# Altium PCB GEARDRONE_LITE_BOM.PcbDoc
Units mm, origin at the board's own origin, x right, y up, seen from the top; angles counter-clockwise.
Board outline 82.98 x 82.51 mm, 4 copper layers (Top Layer, GND, VCC, Bottom Layer), stack 0.852 mm thick; 77 components, 42 nets, 288 pads, 65 vias.
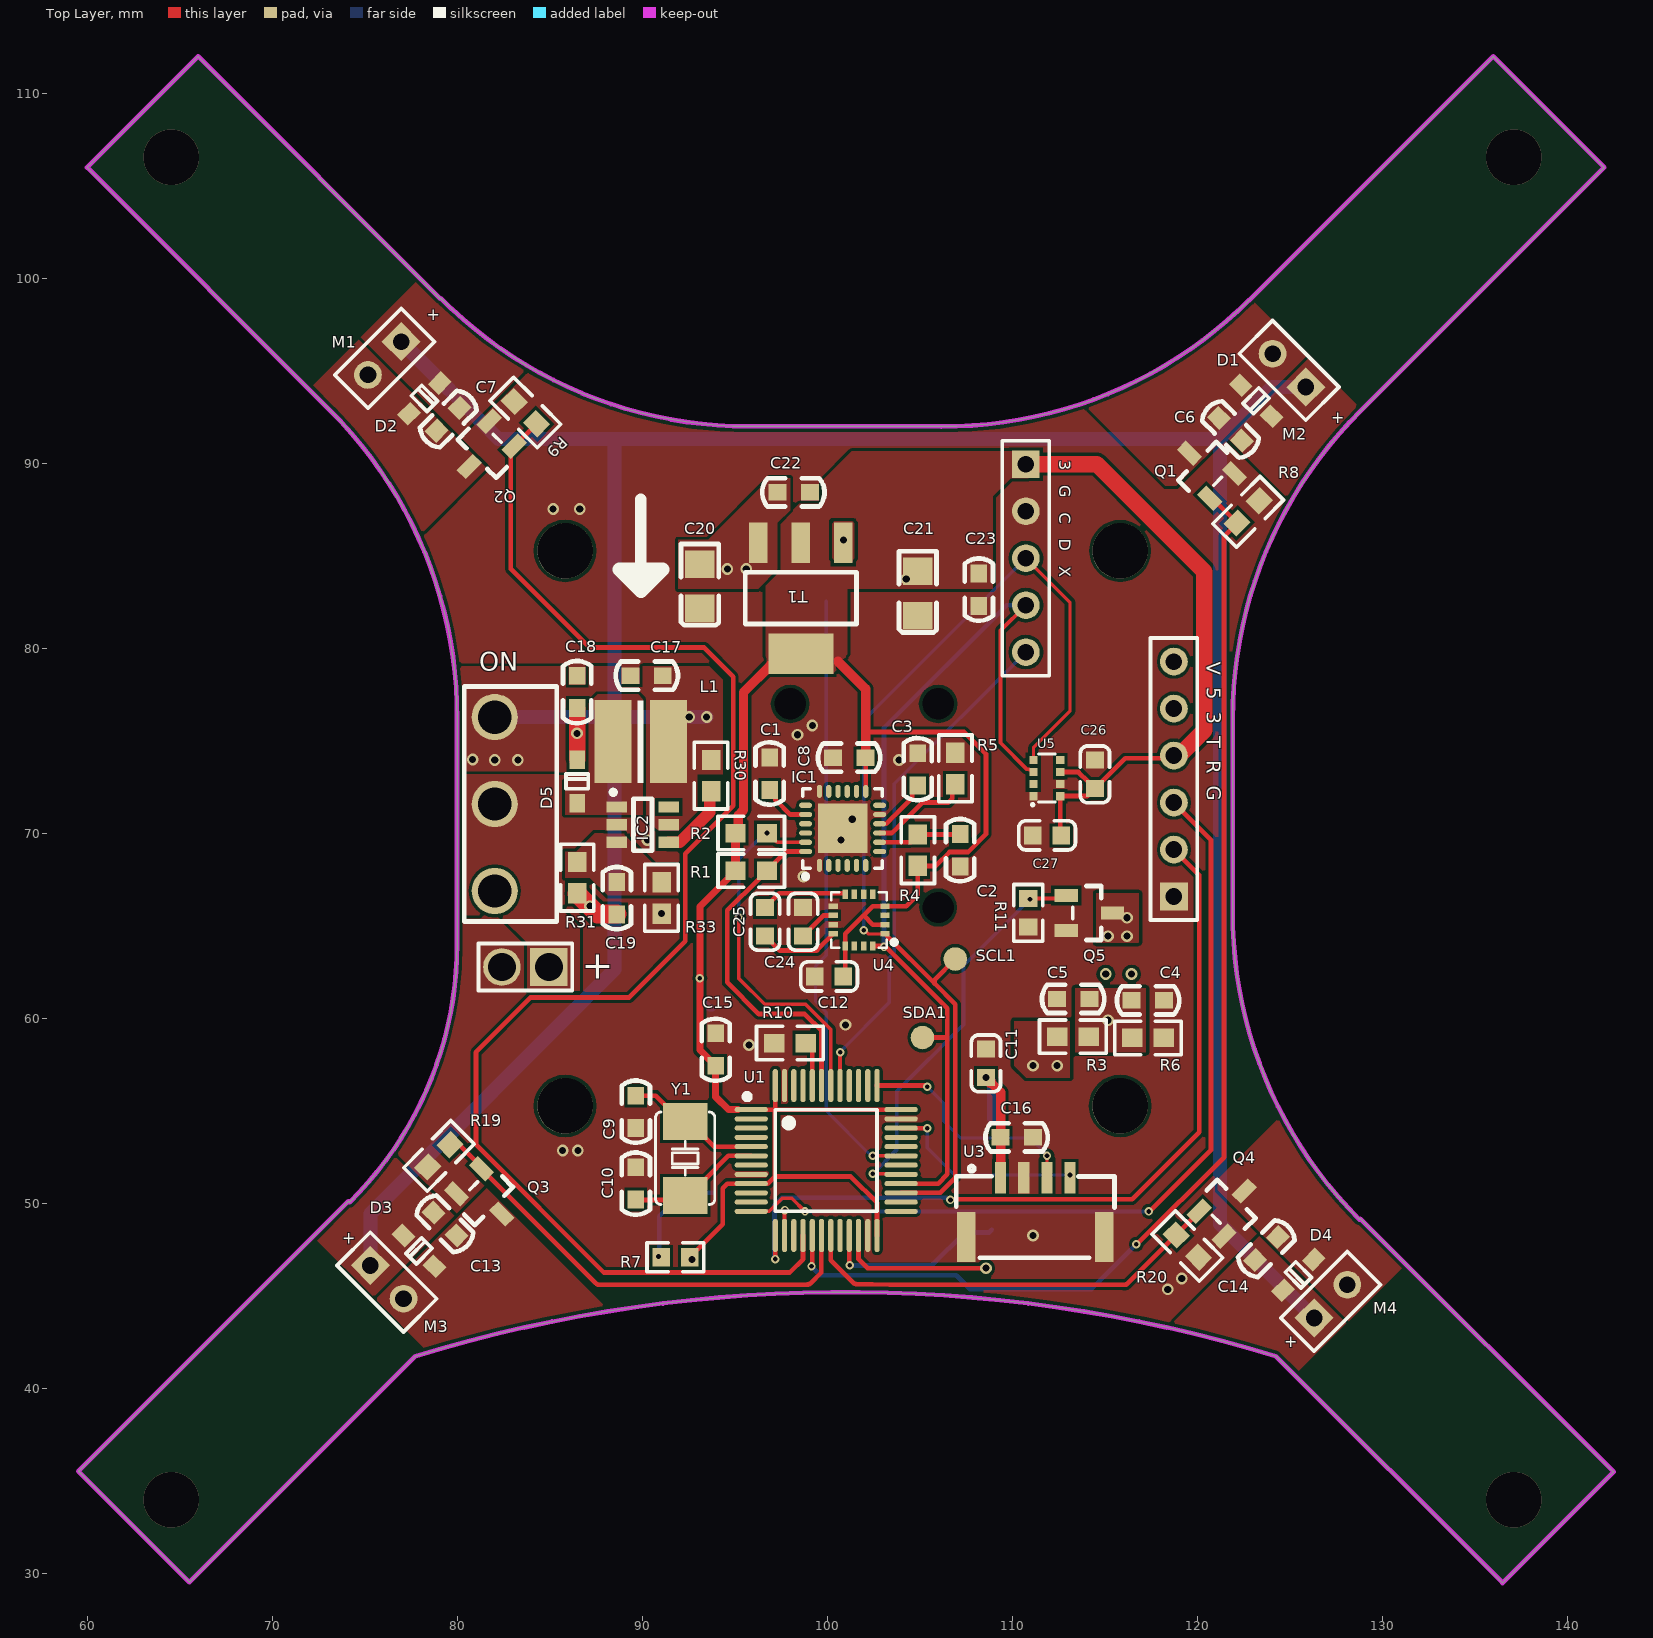
[diagram p0: Top Layer view]
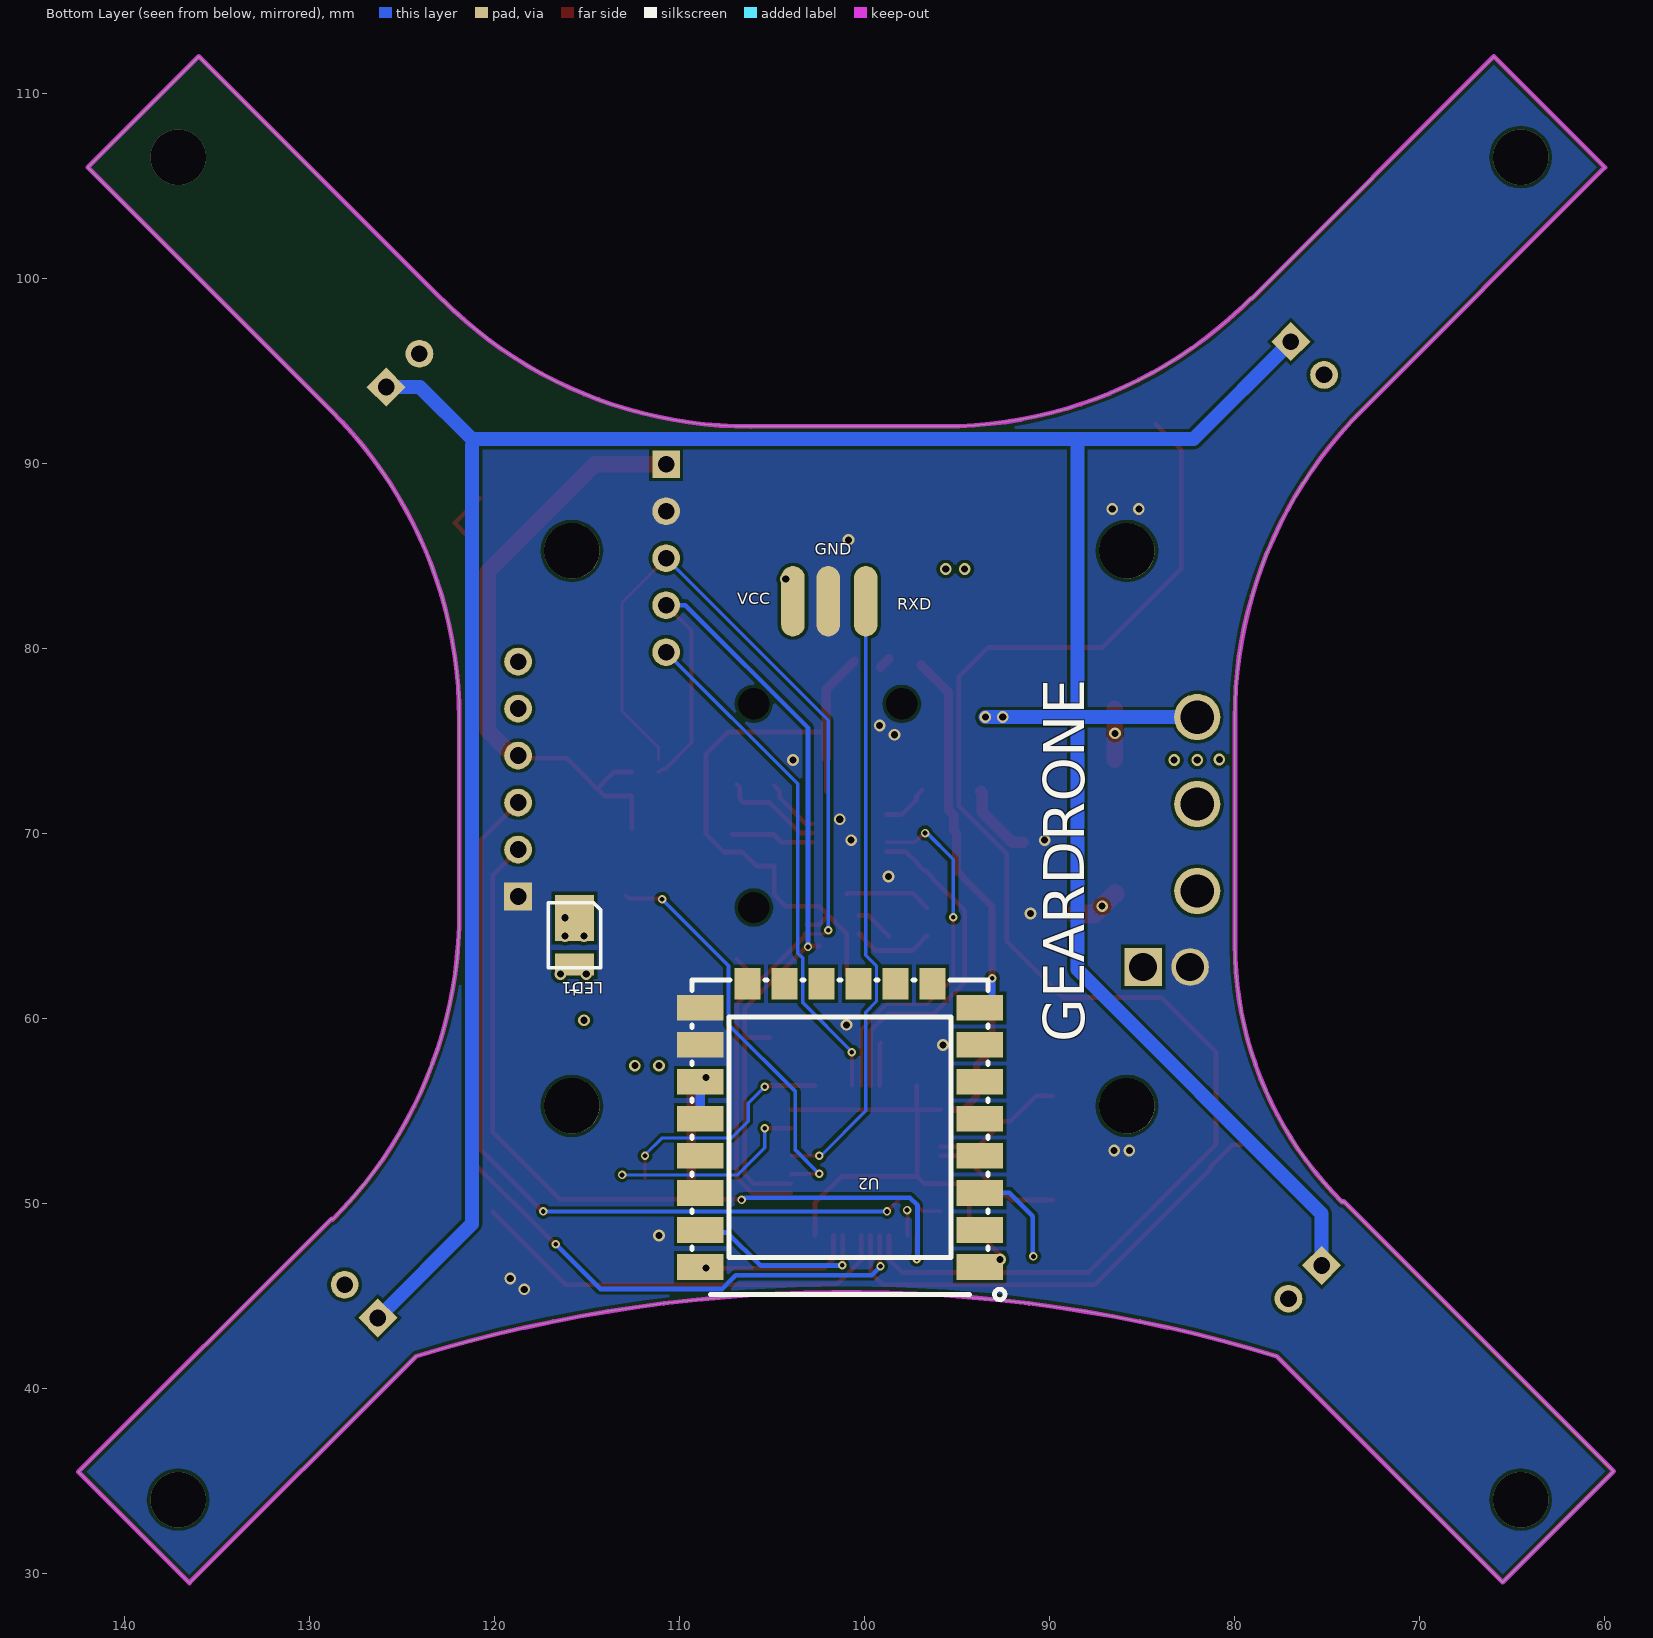
[diagram p1: Bottom Layer view, seen from below]
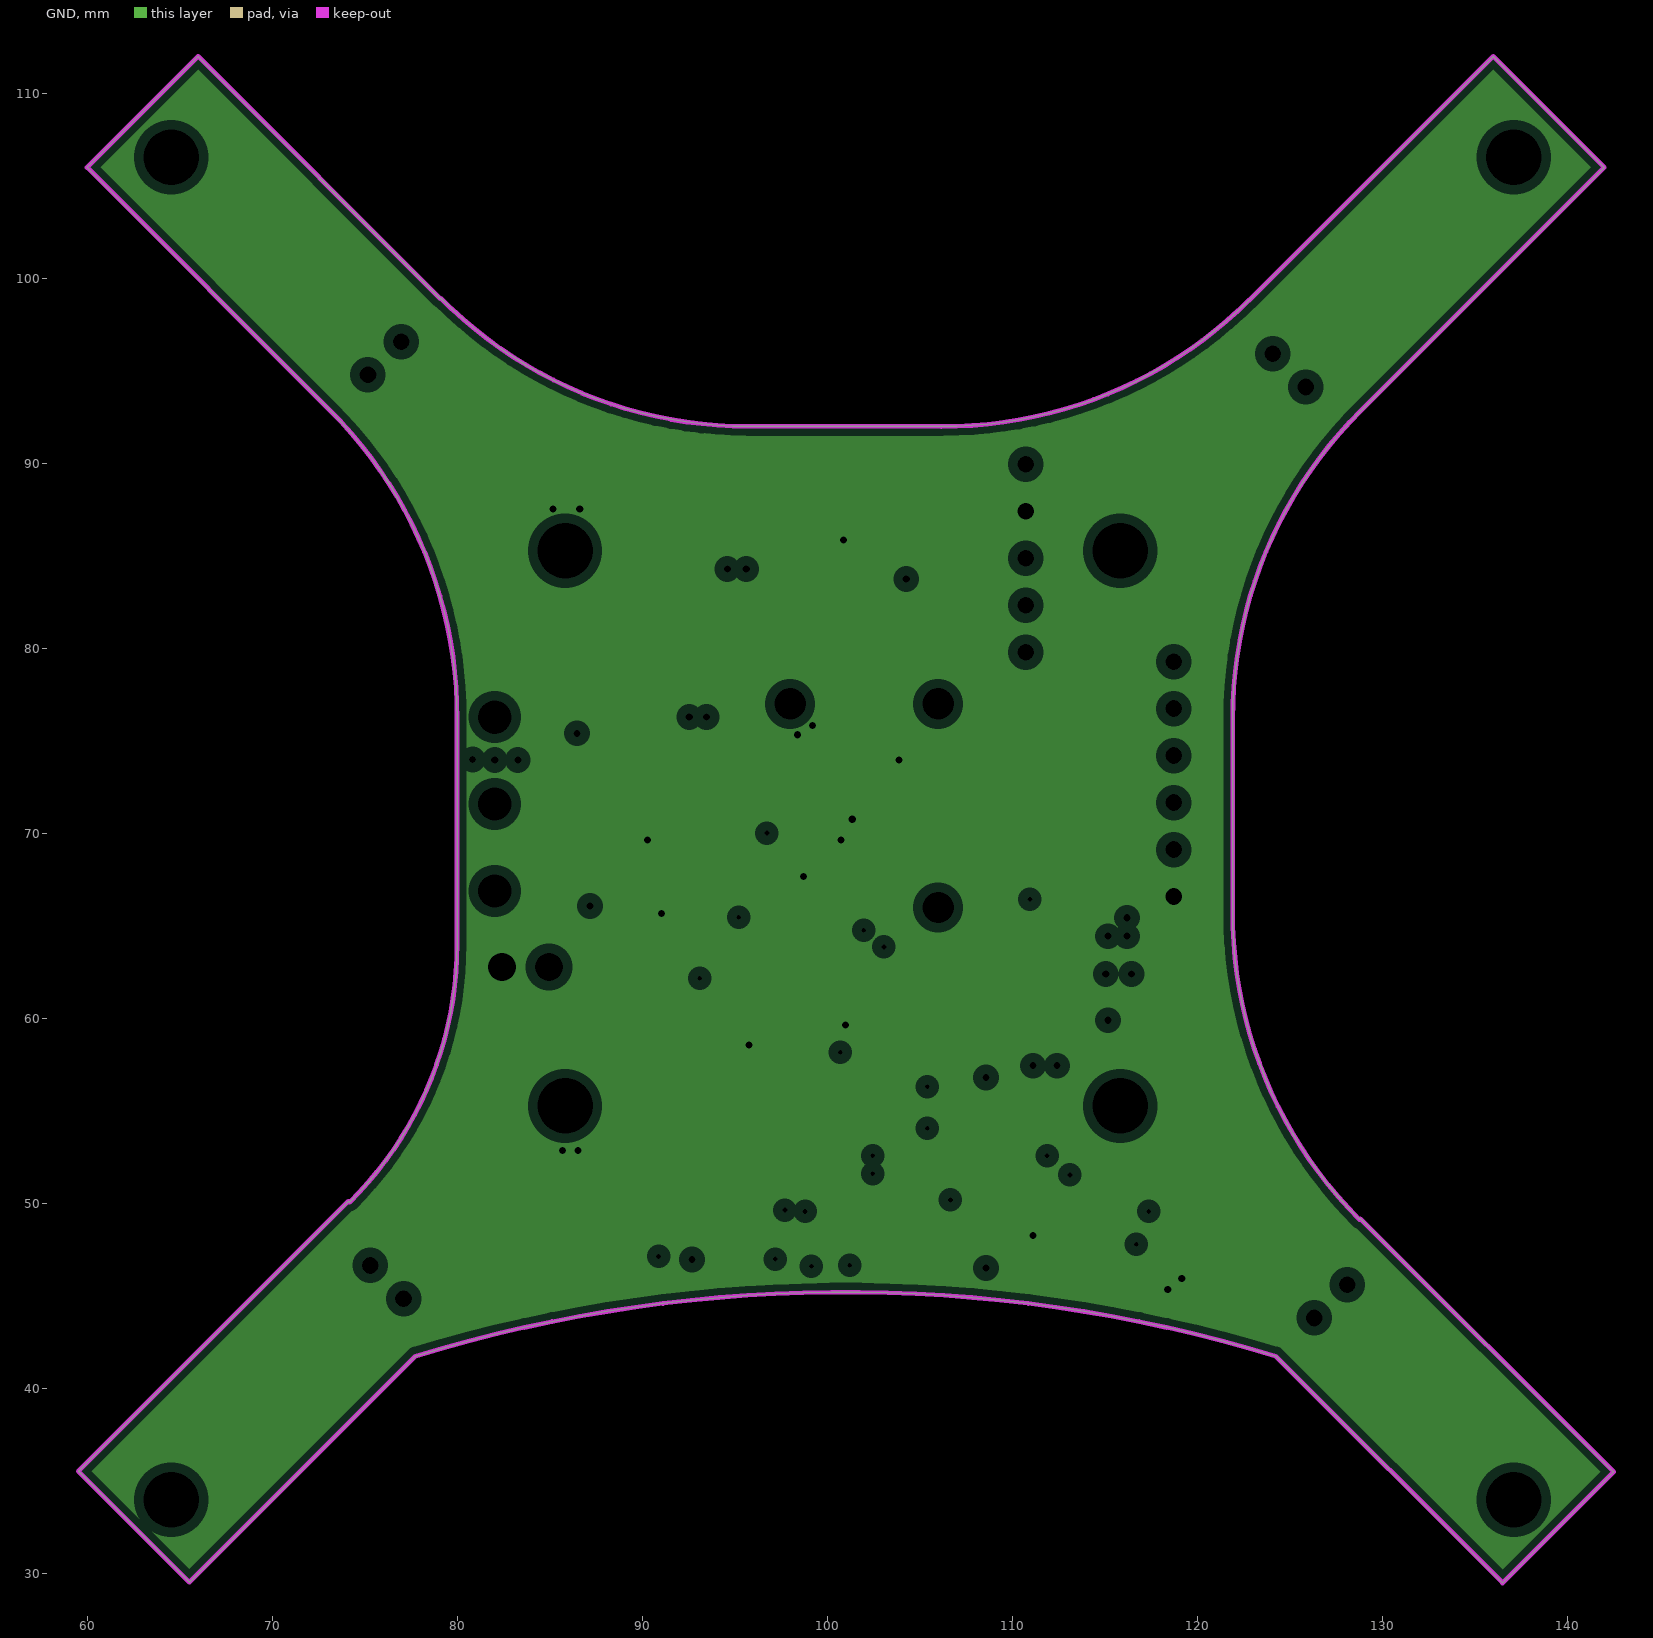
[diagram p2: GND, clearances drawn from the general rule]
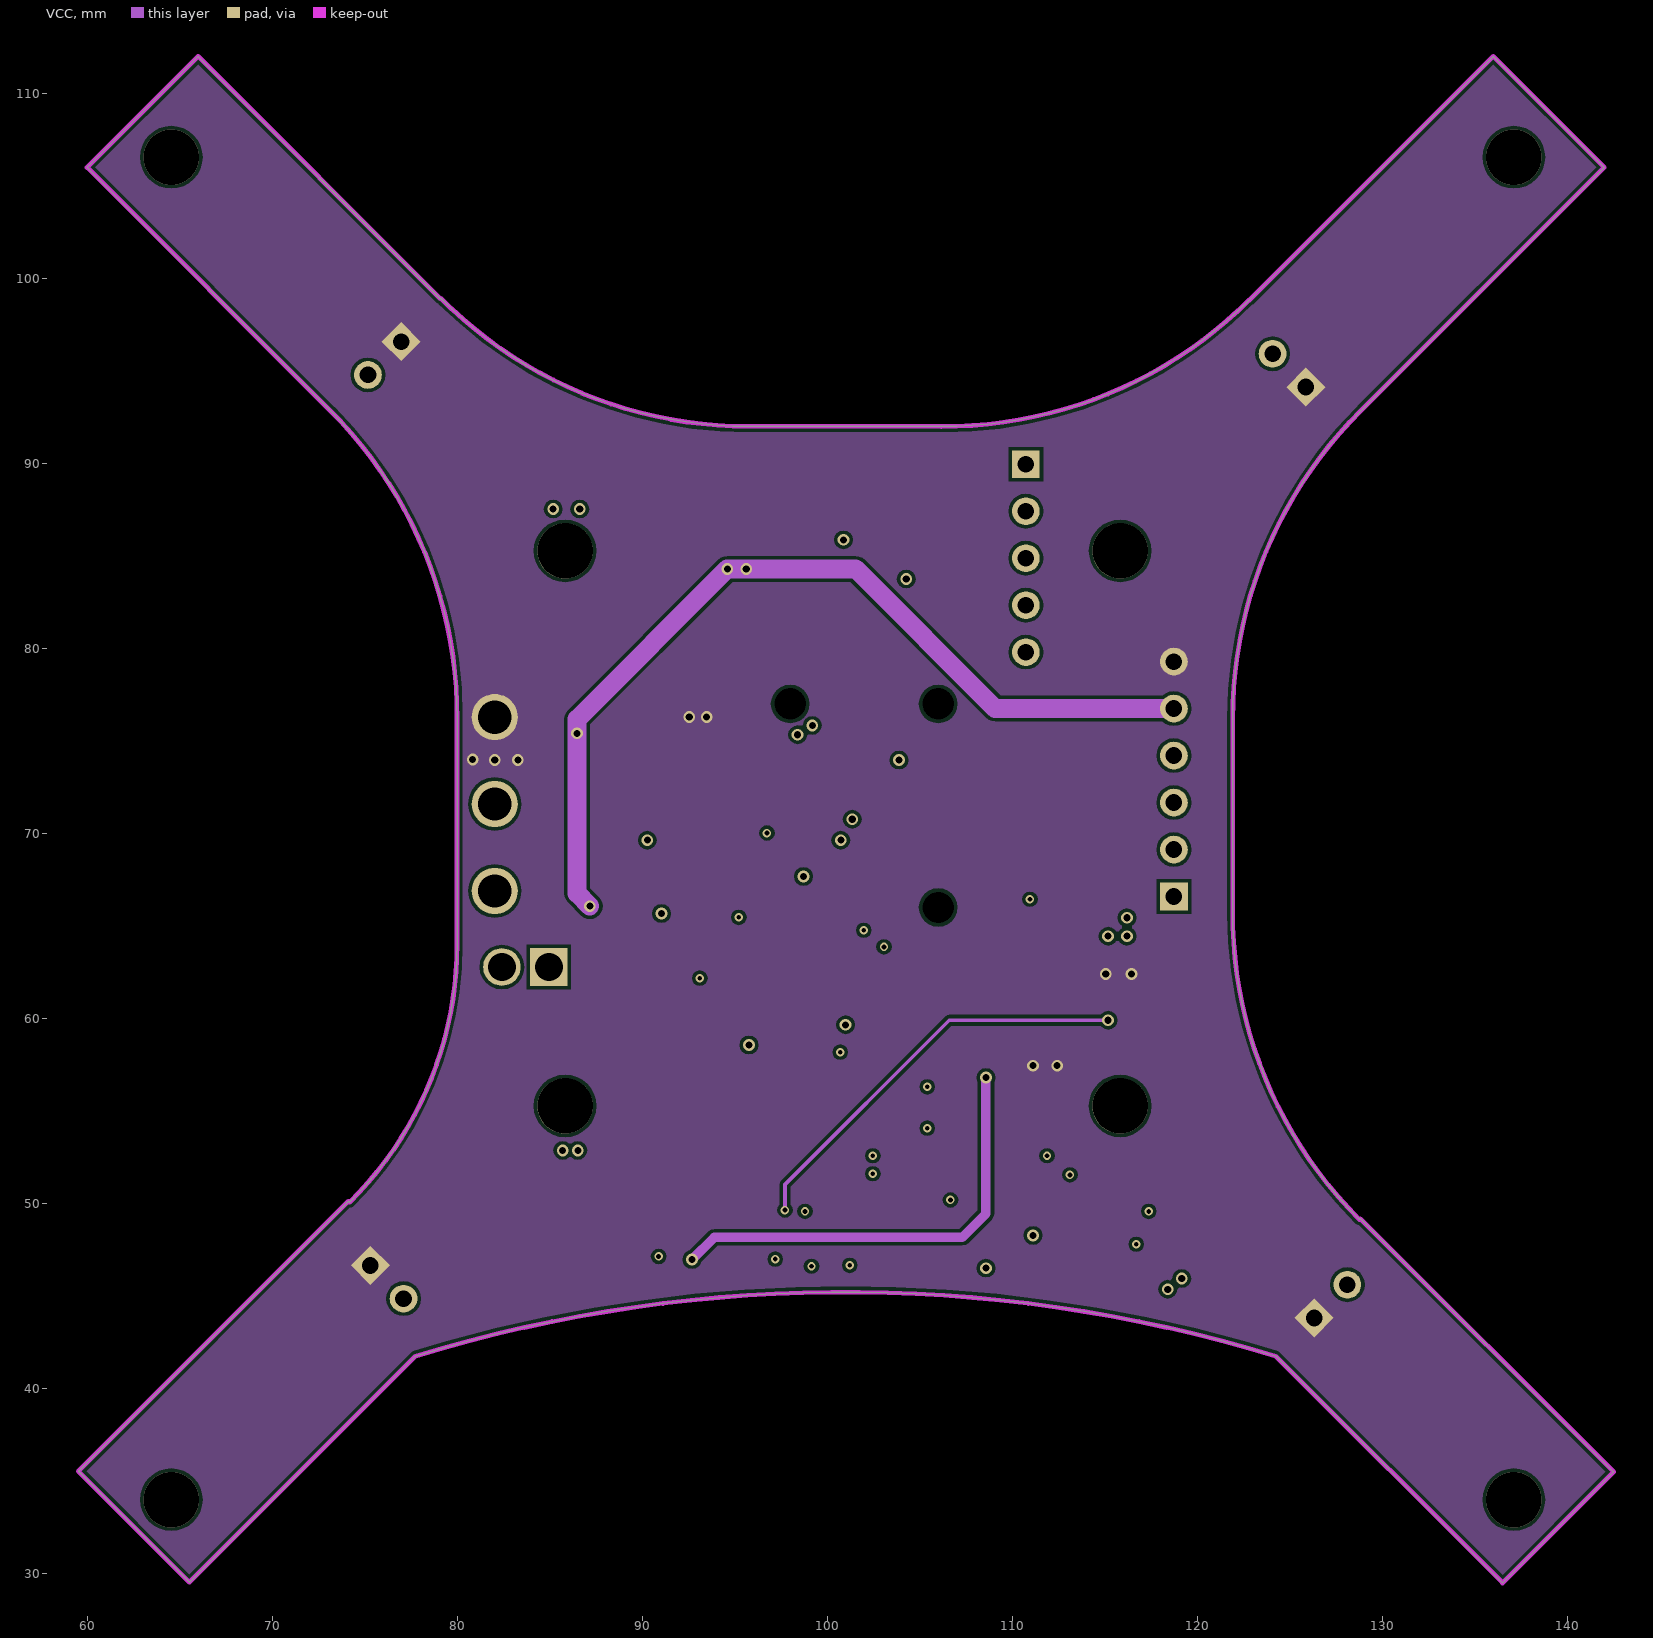
[diagram p3: VCC]
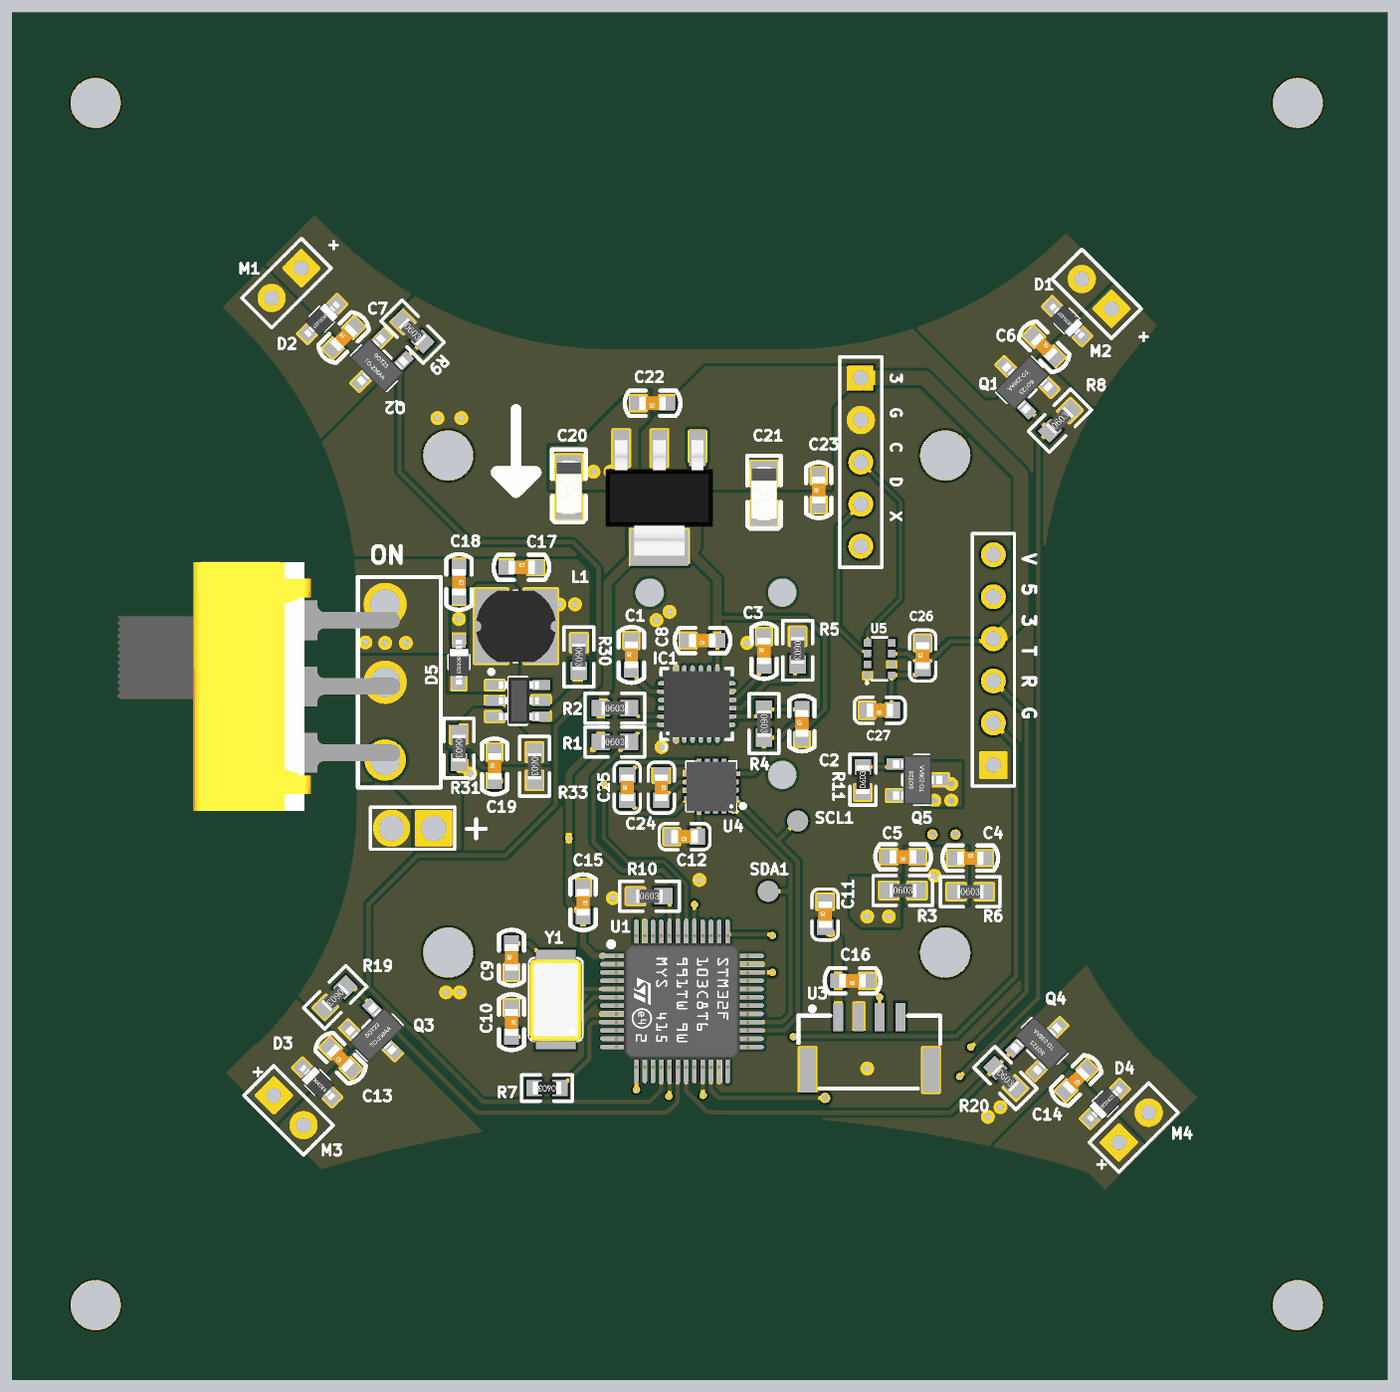
[diagram p4: 3D render of the assembled board from above, using the file's embedded part models]

## Layer stack, top to bottom
Top Solder: solder mask 0.0102, Solder Resist, Dk 3.5
Top Layer: signal copper 0.0356
Dielectric 1: dielectric 0.32, FR-4, Dk 4.8
GND: plane copper 0.035, net GND
Dielectric2: dielectric 0.32, FR-4, Dk 4.8
VCC: signal copper 0.035
Dielectric 2: prepreg 0.0711, PP-006, Dk 4.1
Bottom Layer: signal copper 0.0356
Bottom Solder: solder mask 0.0102, Solder Resist, Dk 3.5

## Board outline
59.533,35.533 65.533,29.533 77.75,41.75 cw(c101,-34.572) 124.25,41.75 136.508,29.492 142.508,35.492 128.817,49.183 128.77,49.136 cw(c145.307,65.673) 121.92,65.786 121.92,76.233 cw(c145.307,76.233) 128.85,92.85 142,106 136,112 122.836,98.836 122.822,98.85 cw(c106.285,115.387) 106.172,92 106.169,92.003 95.738,92.003 cw(c95.738,115.391) 79.121,98.933 79.094,98.906 66,112 60,106 73.151,92.849 73.15,92.85 cw(c56.613,76.313) 80,76.2 80,64.008 cw(c60.38,64.008) 74.186,50.068 74.127,50.127

## Design rules (kind name [scope] priority, off if disabled: settings)
Clearance [All] p1: gap=0.178 ignorepadtopadclearanceinfootprint=FALSE
HoleSize [All] p1: absolutevalues=TRUE maxlimit=5.08 minlimit=0.025 maxpercent=80.000 minpercent=20.000
MinimumSolderMaskSliver [All] p1: minsoldermaskwidth=0
PlaneClearance [All] p1: clearance=0.508
PlaneConnect [All] p1: planeconnectstyle=Direct reliefexpansion=0.508 reliefentries=4 reliefconductorwidth=0.254 reliefairgap=0.254
PolygonConnect [All] p1: connectstyle=Direct reliefconductorwidth=0.254 reliefentries=4 polygonreliefangle="90 Angle" airgapwidth=0.254
RoutingVias [All] p1: holewidth=0.508 width=0.635 viastyle="Through Hole" minholewidth=0.203 minwidth=0.381 maxholewidth=3.81 maxwidth=3.81
SilkToSilkClearance [All] p1: silktosilkclearance=0
SilkToSolderMaskClearance [IsPad] p1: minsilkscreentomaskgap=0 clearancetoexposedcopper=TRUE
SolderMaskExpansion [All] p1: expansion=0.102 istentingtop=FALSE
Width [All] p1: maxlimit=3.048 minlimit=0.178 preferedwidth=0.254
24 further rules are at their usual default settings.

## Components (designator, comment, footprint, x,y, rotation, side; value= is the part's Value field where it differs from the comment)
"3   G   C   D   X" "Header 5" HDR1X5 110.743,89.959 r270 top (schematic designator TOF)
+ "Header 2" HDR1X2#1 84.962,62.781 r180 top (schematic designator POWER1)
C1 "2.2nf" C0603 96.892,72.352 r90 top value=2.2nF
C2 "10nf" C0603 107.187,68.211 r90 top value=10nF
C3 "104" C0603 104.901,72.585 r90 top
C4 "104" C0603 116.458,60.978 r0 top
C5 "106" C0603 114.186,61.054 r180 top
C6 "104" C0603 121.175,92.468 r315 top
C7 "104" C0603 78.897,91.768 r45 top
C8 "104" C0603 102.079,74.105 r180 top
C9 "20pf" C0603 89.661,54.074 r90 top value=22pF
C10 "22pF" C0603 89.661,51.961 r270 top
C11 "104" 0603_C 108.584,57.574 r90 top
C12 "104" 0603_C 100.105,62.273 r180 top
C13 "104" C0603 79.972,48.274 r135 top
C14 "104" C0603 124.369,48.184 r225 top
C15 "104" C0603 93.979,59.2 r270 top
C16 "104" C0603 111.129,53.574 r180 top
C17 "22uf" C0603 89.367,78.529 r0 top value=22uF
C18 "22uf" C0603 86.486,78.529 r270 top value=22uF
C19 "15pf" C0603 88.639,65.617 r90 top value=15pF
C20 "ECAP" TAN-A-3216 93.122,83.355 r270 top
C21 "ECAP" TAN-A-3216 104.901,82.974 r270 top
C22 "0.1uf" C0603 99.066,88.435 r180 top value=0.1uF
C23 "0.1uf" C0603 108.203,82.294 r90 top value=0.1uF
C24 "4.7uf" 0603_C 98.699,65.23 r270 top
C25 "0.22uf" 0603_C 96.646,65.23 r90 top
C26 "104" 0603_C 114.478,73.195 r90 top
C27 "104" 0603_C 111.886,69.897 r180 top
D1 "SS14" SOD-323 123.189,93.388 r135 top
D2 "SS14" SOD-323 78.231,93.515 r225 top
D3 "SS14" SOD-323 77.94,47.44 r315 top
D4 "SS14" SOD-323 125.475,46.144 r45 top
D5 "SS14" SOD-323 86.486,72.814 r270 top
GND "TestPoint" TestPoint#1 101.981,82.55 r90 bottom
IC1 "MPU6050" LC-QFN-24_4X4X05P 100.837,70.274 r0 top
IC2 "SX1308" LC-SOT-23-6 90.039,70.474 r180 top
L1 "4.7uH" CD43NP 89.915,74.973 r180 top
LED1 "EFD3-G9CA-P1WF" LED3528 115.696,64.178 r270 bottom
M1 "Header 2" HDR1X2#2 76.979,96.581 r225 top
M2 "Header 2" HDR1X2#2 125.874,94.132 r135 top
M3 "Header 2" HDR1X2#2 75.31,46.652 r315 top
M4 "Header 2" HDR1X2#2 126.321,43.815 r45 top
ON "SW-SPDT" SW-TH_SS-12D10L5 82.036,71.591 r270 top (schematic designator S1)
Q1 "SI2302" LC-SOT-23(SOT-23-3) 120.468,89.674 r315 top
Q2 "SI2302" LC-SOT-23(SOT-23-3) 81.533,90.721 r45 top
Q3 "SI2302" LC-SOT-23(SOT-23-3) 81.528,50.316 r135 top
Q4 "SI2302" LC-SOT-23(SOT-23-3) 121.666,49.788 r225 top
Q5 "SI2302" LC-SOT-23(SOT-23-3) 114.172,65.702 r180 top
R1 "10k" R0603 95.899,67.988 r0 top value=10KΩ
R2 "10k" R0603 95.899,70.024 r0 top value=10KΩ
R3 "10k" R0603 113.283,59.022 r0 top value=10KΩ
R4 "0" R0603 104.901,69.096 r270 top value=0Ω
R5 "0" R0603 106.933,73.518 r270 top value=0Ω
R6 "10k" R0603 117.347,58.946 r0 top value=10KΩ
R7 "10k" 0603_R 91.803,47.095 r180 top value=10KΩ
R8 "10k" R0603 122.759,87.383 r45 top value=10KΩ
R9 "10k" R0603 83.692,92.753 r315 top value=10KΩ
R10 "10kΩ" R0603 97.986,58.674 r0 top value=10KΩ
R11 "10k" 0603_R 110.87,65.71 r90 top value=10KΩ
R19 "10k" R0603 79.02,52.574 r225 top value=10KΩ
R20 "10k" R0603 119.472,47.702 r315 top value=10KΩ
R30 "100k" R0603 93.725,73.124 r270 top value=100KΩ
R31 "73.2k" R0603 86.486,67.612 r270 top value=73.2KΩ
R33 "10k" R0603 91.05,66.519 r270 top value=10KΩ
RXD "TestPoint" TestPoint#1 99.949,82.55 r90 bottom
SCL1 "TestPoint" TestPoint#2 106.933,63.215 r90 top
SDA1 "TestPoint" TestPoint#2 105.155,58.971 r90 top
T1 "AMS1117-3.3" LC-SOT-223 98.583,82.72 r90 top
U1 "STM32F103C8T6" LC-LQFP-48_7X7X05P 99.949,52.324 r270 top
U2 "ESP-12F(ESP8266MOD)" WIFIM-SMD_ESP-12F-ESP8266MOD 101.346,54.229 r90 bottom
U3 "SM04B-GHS-TB(LF)(SN)" CONN-SMD_4P-P1.25_SM04B-GHS-TB-LF-SN 111.252,49.784 r0 top
U4 "QMC5883L" LPCC-16_L3.0-W3.0-P0.50-BL 101.726,65.321 r90 top
U5 "SPL06-001" SENSOR-SMD_SPL06-001 111.876,72.995 r270 top
"V  5  3  T  R  G" "Header 6" HDR1X6 118.744,66.591 r90 top (schematic designator "V 5 3 T R")
VCC "TestPoint" TestPoint#1 103.886,82.55 r90 bottom
Y1 "5032" SMD5032-2 92.329,52.443 r90 top

## Footprints (in the part's own frame and the unit in brackets; to place one, negate y for a bottom-side part, rotate by r counter-clockwise, add the part's x,y. Pads: shape width x height; smd on the part's side, far side on the other; paste and mask are expansions set on the pad)
0603_C [mm]
  rect 0.93x0.98 smd: 1(-0.77,0) 2(0.77,0)
  silkscreen extent -1.53,-0.79 1.54,0.79, body extent -0.8,-0.4 0.8,0.4, height 0.3
0603_R [mm]
  rect 0.93x0.98 smd: 1(-0.77,0) 2(0.77,0)
  silkscreen extent -1.53,-0.79 1.54,0.79, body extent -0.85,-0.4 0.85,0.4, height 0.56
C0603 [mil]
  rect 38x35 smd: 1(0,0) 2(69,0)
  silkscreen extent -31,-30 101,30, body extent 4,-16 67,16, height 12
CD43NP [mm] "功率电感"
  rect 2x4.5 smd: 1(-1.512,0) 2(1.488,0)
  silkscreen extent -0.17,-2.21 0.17,2.24, body extent -2.41,-2.14 2.39,2.16, height 3.5
CONN-SMD_4P-P1.25_SM04B-GHS-TB-LF-SN [mm]
  rect 0.6x1.7 smd: 1(-1.876,1.6) 2(-0.626,1.6) 3(0.624,1.6) 4(1.875,1.6)
  rect 1x2.7 smd: 5(3.725,-1.6) 6(-3.725,-1.6)
  silkscreen extent -4.27,-2.71 4.28,2.24
HDR1X2#1 [mil] "Connector; Header; 2 Position"
  rect 80x80 hole 60: 1(0,0)
  round 80 hole 60: 2(100,0)
  silkscreen extent -50,-50 150,50
HDR1X2#2 [mil] "Connector; Header; 2 Position"
  rect 59.06x59.06 hole 35.43: 1(0,0)
  round 59.06 hole 35.43: 2(100,0)
  silkscreen extent -50,-50 150,50
HDR1X5 [mm] "Connector; Header; 5 Position"
  rect 1.5x1.5 hole 0.9: 1(0,0)
  round 1.5 hole 0.9: 2(2.54,0) 3(5.08,0) 4(7.62,0) 5(10.16,0)
  silkscreen extent -1.27,-1.27 11.43,1.27
HDR1X6 [mm] "Connector; Header; 6 Position"
  rect 1.5x1.5 hole 0.9: 1(0,0)
  round 1.5 hole 0.9: 2(2.54,0) 3(5.08,0) 4(7.62,0) 5(10.16,0) 6(12.7,0)
  silkscreen extent -1.27,-1.27 13.97,1.27
LC-LQFP-48_7X7X05P [mm]
  oval 0.28x1.8 smd mask+0.051: 1(-2.75,-4.05) 2(-2.25,-4.05) 3(-1.75,-4.05) 4(-1.25,-4.05) 5(-0.75,-4.05) 6(-0.25,-4.05) 7(0.25,-4.05) 8(0.75,-4.05) 9(1.25,-4.05) 10(1.75,-4.05) 11(2.25,-4.05) 12(2.75,-4.05) 25(2.75,4.05) 26(2.25,4.05) 27(1.75,4.05) 28(1.25,4.05) 29(0.75,4.05) 30(0.25,4.05) 31(-0.25,4.05) 32(-0.75,4.05) 33(-1.25,4.05) 34(-1.75,4.05) 35(-2.25,4.05) 36(-2.75,4.05)
  oval 1.8x0.28 smd mask+0.051: 13(4.05,-2.75) 14(4.05,-2.25) 15(4.05,-1.75) 16(4.05,-1.25) 17(4.05,-0.75) 18(4.05,-0.25) 19(4.05,0.25) 20(4.05,0.75) 21(4.05,1.25) 22(4.05,1.75) 23(4.05,2.25) 24(4.05,2.75) 37(-4.05,2.75) 38(-4.05,2.25) 39(-4.05,1.75) 40(-4.05,1.25) 41(-4.05,0.75) 42(-4.05,0.25) 43(-4.05,-0.25) 44(-4.05,-0.75) 45(-4.05,-1.25) 46(-4.05,-1.75) 47(-4.05,-2.25) 48(-4.05,-2.75)
  silkscreen extent -3.6,-4.42 2.75,2.75, body extent -4.5,-4.5 4.5,4.5, height 1.4
LC-QFN-24_4X4X05P [mm]
  rect 2.68x2.68 smd mask+0.051: 0(0,0)
  oval 0.28x0.7 smd mask+0.051: 1(-1.25,-2) 2(-0.75,-2) 3(-0.25,-2) 4(0.25,-2) 5(0.75,-2) 6(1.25,-2) 13(1.25,2) 14(0.75,2) 15(0.25,2) 16(-0.25,2) 17(-0.75,2) 18(-1.25,2)
  oval 0.7x0.28 smd mask+0.051: 7(2,-1.25) 8(2,-0.75) 9(2,-0.25) 10(2,0.25) 11(2,0.75) 12(2,1.25) 19(-2,1.25) 20(-2,0.75) 21(-2,0.25) 22(-2,-0.25) 23(-2,-0.75) 24(-2,-1.25)
  silkscreen extent -2.15,-2.72 2.15,2.15, body extent -2.02,-2.04 2.02,2, height 0.88
LC-SOT-23(SOT-23-3) [mm]
  rect 1.25x0.7 smd: 1(1.25,-0.95) 2(1.25,0.95) 3(-1.25,0)
  silkscreen extent -0.65,-1.46 0.9,1.46, body extent -1.5,-1.5 1.5,1.5, height 1.3
LC-SOT-23-6 [mm]
  rect 1.1x0.6 smd: 1(1.4,-0.95) 2(1.4,0) 3(1.4,0.95) 4(-1.4,0.95) 5(-1.4,0) 6(-1.4,-0.95)
  silkscreen extent -0.5,-1.87 1.72,1.4, body extent -1.28,-1.39 1.14,1.4, height 1.09
LC-SOT-223 [mm]
  rect 2.2x1 smd: 1(3,-2.3) 2(3,0) 3(3,2.3)
  rect 2.2x3.5 smd: 2(-3,0)
  silkscreen extent -1.4,-3 1.4,3, body extent -3.49,-3.24 3.49,3.24, height 1.64
LED3528 [mm]
  rect 2.5x2.1 smd: 1(-1.257,0)
  rect 1.2x2.1 smd: 2(1.257,0)
  silkscreen extent -2.07,-1.42 1.44,1.42, body extent -2.09,-1.4 1.41,1.4, height 1.8
LPCC-16_L3.0-W3.0-P0.50-BL [mm]
  rect 0.3x0.5 smd: 1(-0.749,-1.4) 2(-0.249,-1.4) 3(0.251,-1.4) 4(0.751,-1.4) 9(0.75,1.4) 10(0.25,1.4) 11(-0.25,1.4) 12(-0.751,1.4)
  rect 0.5x0.3 smd: 5(1.4,-0.748) 6(1.4,-0.248) 7(1.4,0.252) 8(1.4,0.752) 13(-1.4,0.752) 14(-1.4,0.252) 15(-1.4,-0.248) 16(-1.4,-0.748)
  silkscreen extent -1.5,-2.02 1.5,1.5, body extent -1.52,-1.5 1.48,1.5, height 0.9
R0603 [mm]
  rect 1.1x1 smd: 1(-0.85,0) 2(0.85,0)
  silkscreen extent -1.8,-0.9 1.8,0.9, body extent -0.8,-0.4 0.8,0.4, height 0.45
SENSOR-SMD_SPL06-001 [mm]
  rect 0.45x0.45 smd: 1(0.975,-0.725) 2(0.325,-0.725) 3(-0.325,-0.725) 4(-0.975,-0.725) 5(-0.975,0.725) 6(-0.325,0.725) 7(0.325,0.725) 8(0.975,0.725)
  silkscreen extent -1.3,-0.84 1.51,0.45
SMD5032-2 [mm]
  rect 2x2.4 smd: 1(-2,0) 2(2,0)
  silkscreen extent -2.5,-1.6 2.5,1.6, body extent -2.53,-1.6 2.41,1.6, height 0.85
SOD-323 [mm]
  rect 1x0.83 smd: 1(1.18,0) 2(-1.18,0)
  silkscreen extent -0.4,-0.6 0.4,0.6, body extent -1.35,-0.62 1.35,0.63, height 1.1
SW-TH_SS-12D10L5 [mil]
  round 98.4 hole 70.9 mask+2: 1(-185,0) 2(0,0) 3(185,0)
  silkscreen extent -250,-65 250,132, body extent -287,-637 305,36, height 174
TAN-A-3216 [mm]
  rect 1.5x1.6 smd: 1(-1.2,0) 2(1.2,0)
  silkscreen extent -2.29,-1.02 2.11,1.02, body extent -1.6,-0.8 1.6,0.8, height 1.6
TestPoint#1 [mm]
  oval 3.81x1.27 smd: 1(0,0)
TestPoint#2 [mm]
  round 1.27 smd: 1(0,0)
WIFIM-SMD_ESP-12F-ESP8266MOD [mm]
  rect 1.4x2.5 smd: 1(-7.651,-7.551) 2(-5.651,-7.551) 3(-3.651,-7.551) 4(-1.651,-7.551) 5(0.349,-7.551) 6(2.349,-7.551) 7(4.349,-7.551) 8(6.349,-7.551) 9(6.349,7.549) 10(4.349,7.55) 11(2.349,7.551) 12(0.349,7.551) 13(-1.651,7.55) 14(-3.651,7.551) 15(-5.651,7.55) 16(-7.651,7.551)
  rect 1.7x1.4 smd: 17(7.65,-5) 18(7.649,-3.002) 19(7.649,-1.003) 20(7.649,0.998) 21(7.649,2.997) 22(7.65,4.997)
  silkscreen extent -9.43,-8.92 7.85,8

## Part data
"3   G   C   D   X": "Header, 5-Pin", LatestRevisionDate=17-Jul-2002, LatestRevisionNote="Re-released for DXP Platform.", Publisher="Altium Limited"
+ M1 M2 M3 M4: "Header, 2-Pin", LatestRevisionDate=17-Jul-2002, LatestRevisionNote="Re-released for DXP Platform.", Publisher="Altium Limited"
C1 C2 C3 C4 C5 C6 C7 C8 C11 C12 C13 C14 C15 C16 C17 C18 C19 C22 C23 C24 C25 C26 C27: library part "Cap Chip 0603", "Polarized Capacitor (Radial)", Published=8-Jun-2000, Publisher="Altium Limited", Revision="July-2002: Re-released for DXP Platform."
C9 C10: library part "Cap Chip 0805", "Polarized Capacitor (Radial)", Published=8-Jun-2000, Publisher="Altium Limited", Revision="July-2002: Re-released for DXP Platform."
D1 D2 D3 D4 D5: library part DIODE-TVS
IC1: "三轴陀螺仪"
L1: library part "Inductor Chip", "Inductor", Published=8-Jun-2000, Publisher="Altium Limited", Revision="July-2002: Re-released for DXP Platform."
LED1: BOM_JLCPCB Part Class="Extended Part", BOM_Manufacturer=APt, BOM_Manufacturer Part=EFD3-G9CA-P1WF, BOM_Supplier=LCSC, BOM_Supplier Part=C507038, Contributor=LCSC, spicePre=L, spiceSymbolName=EFD3-G9CA-P1WF
ON: "SPDT Subminiature Toggle Switch, Right Angle Mounting, Vertical Actuation", Datasheet="Latest Revision: 05-Dec-2000", Published=24-Mar-1999, Publisher="Altium Limited", Revision 1="Jul-2002: Re-released for DXP Platform.", Revision 2="17-Dec-2003: Schematic revised, PCB Footprint replaced."
Q1 Q2 Q3 Q4 Q5: library part HANDSOME-SI2302-N
R1 R2 R3 R4 R5 R6 R7 R8 R9 R10 R11 R19 R20 R30 R31 R33: library part "Resistor Chip 0805", "Resistor", Published=8-Jun-2000, Publisher="Altium Limited", Revision="July-2002: Re-released for DXP Platform."
T1: library part AMS1117-XX, "AMS   800mA LOW DROPOUT VOLTAGE REGULATOR"
U1: "STM32 ARM-based 32-bit MCU with 64 Kbytes Flash, 48-pin LQFP, Industrial Temperature"
U2: BOM_JLCPCB Part Class="Extended Part", BOM_Manufacturer=Ai-Thinker, BOM_Manufacturer Part=ESP-12F(ESP8266MOD), BOM_Supplier=LCSC, BOM_Supplier Part=C82891, spicePre=U, spiceSymbolName=ESP-12F(ESP8266MOD)
U3: BOM_JLCPCB Part Class="Extended Part", BOM_Manufacturer="JST Sales America", BOM_Manufacturer Part=SM04B-GHS-TB(LF)(SN), BOM_Supplier=LCSC, BOM_Supplier Part=C189895, Contributor=LCSC, spicePre=U, spiceSymbolName=SM04B-GHS-TB(LF)(SN)
U4: library part HMC5883L, BOM_JLCPCB Part Class="Extended Part", BOM_Manufacturer=null, BOM_Manufacturer Part=HMC5883L, BOM_Supplier=LCSC, BOM_Supplier Part=C2859540, Contributor=LCSC, spicePre=U, spiceSymbolName=HMC5883L
U5: BOM_JLCPCB Part Class="Extended Part", BOM_Manufacturer=Goertek(歌尔), BOM_Manufacturer Part=SPL06-001, BOM_Supplier=LCSC, BOM_Supplier Part=C2684428, Contributor=LCSC, spicePre=U, spiceSymbolName=SPL06-001
"V  5  3  T  R  G": "Header, 6-Pin", LatestRevisionDate=17-Jul-2002, LatestRevisionNote="Re-released for DXP Platform.", Publisher="Altium Limited"
Y1: library part XTAL, "Crystal Oscillator", Frequency=8MHz, Published=8-Jun-2000, Publisher="Altium Limited", Revision="July-2002: Re-released for DXP Platform."
C20 C21: =10uF

## Free pads (board coordinates)
  round 3 hole 3: 7(85.837,55.274) 7(85.837,85.274) 7(115.837,55.274) 7(115.837,85.274)
  round 1.5 hole 1.7: 11(98,77) 11(106,66) 11(106,77)

## Via types
v1: diameter 0.635, hole 0.381, Top Layer to Bottom Layer, 39 vias
v2: diameter 0.457, hole 0.254, Top Layer to Bottom Layer, 22 vias
v3: diameter 3, hole 3, Top Layer to Bottom Layer, 4 vias

## Nets (pads, with @x,y where several pads share a name; then routed paths per layer and width w, separated by ;. In a path a pad name is that pad's centre, name@x,y a point inside that pad or via, vN(x,y) a via of type N, cw(c..) or ccw(c..) an arc to the next point about the centre after c; other vN are vias at no path point)
3.3: "3   G   C   D   X.1" "V  5  3  T  R  G.4" C8.1 C11.1 C12.1 C15.2 C16.2 C21.1 C23.2 C26.1 C27.1 IC1.13 R1.1 R2.1 R4.2 R7.1 T1.2 U1.1 U1.9 U1.24 U1.36 U1.48 U2.1 U2.8 U2.11 U2.12 U3.1 U4.2 U4.4 U4.13 U5.6 U5.8 VCC.1 | length 157
  Top Layer w0.254: R7.1 92.573,47.12 92.911,47.458 92.936,47.458 94.36,48.882 94.36,50.83 94.604,51.074 U1.9 95.904,51.079 96.793,51.079 97.172,51.458 ; U1.1 97.172,55.074 ; U1.48 97.199,55.074 ; C12.1 100.974,62.372 U4.13 100.974,64.572 101.974,65.572 ; C8.1 102.087,74.097 IC1.13 ; 102.079,75.481 107.404,75.481 108.584,74.301 108.584,69.961 107.621,68.998 106.616,68.998 105.864,68.246 R4.2 104.901,66.699 104.275,66.072 U4.4 102.474,66.072 101.974,65.572 ; U1.24 102.699,50.044 101.285,51.458 97.172,51.458 ; U4.2 102.474,65.072 101.974,65.572 ; U1.36 97.199,55.074 ; C27.1@112.601,70.274 U5.8 114.048,72.02 C26.1@114.453,72.425 ; U5.6 113.583,73.32 114.115,72.788 114.115,72.763 C26.1@114.453,72.425 ; 118.879,74.064 116.117,74.064 114.841,72.788 114.841,72.763 114.503,72.425 C26.1 C26.1@114.453,72.425 ; 97.172,51.458 97.172,55.074 ; 97.172,55.074 97.199,55.074
  Top Layer w0.381: R1.1 94.999,67.988 94.69,67.679 94.69,67.629 93.122,66.061 v2(93.122,62.182) 93.122,58.304 93.687,57.739 93.725,57.739 93.979,57.485 C15.2 93.979,55.755 94.66,55.074 94.92,55.074 94.928,55.082 U1.1@95.19,55.082
  Top Layer w0.508: R1.1 R2.1 95.198,70.173 95.198,70.987 95.479,71.268 95.479,77.63 T1.2@96.963,79.114 ; T1.2@98.699,79.451 T1.2@99.158,78.992 ; 100.59,79.303 102.079,77.814 102.079,75.481 C8.1 ; C11.1@108.82,56.568 109.376,56.012 C16.2 U3.1
  Top Layer w0.635: C11.1@108.797,56.591 C11.1@108.82,56.568
  Top Layer w0.889: 110.743,89.959 114.584,89.959 120.395,84.148 120.395,75.58 118.879,74.064
  VCC w0.508: v1(92.699,46.968) 93.906,48.176 107.314,48.176 108.584,49.446 v1(108.584,56.804)
  Bottom Layer w0.381: v2(93.122,62.182) 93.122,61.088 93.631,60.578 U2.8
  Bottom Layer w0.508: U2.12 U2.11
  other v1: 104.278,83.752
5V: "V  5  3  T  R  G.5" C18.2 C19.1 C20.1 C22.2 D5.2 R31.2 T1.3 | length 54.7
  Top Layer w0.889: D5.2 86.486,75.481 C18.2@86.486,76.738
  Top Layer w1.016: R31.2 86.486,66.728 86.494,66.72 86.528,66.72 v1(87.175,66.072) 87.603,65.645 C19.1@88.639,65.645
  VCC w1.016: v1(87.175,66.072) 86.486,66.762 v1(86.486,75.414) 86.486,76.18 v1(94.604,84.298) v1(95.63,84.298) 101.54,84.298 109.087,76.751 118.39,76.751 118.444,76.697 118.786,76.697 118.879,76.604
CLK: U1.37 U3.3 | length 12.6
  Top Layer w0.178: U3.3 111.886,51.393 v2(111.886,52.578)
  Top Layer w0.254: U1.37 105.339,56.374 v2(105.409,56.304)
  Bottom Layer w0.178: v2(105.409,56.304) 106.298,55.415 106.298,54.443 107.196,53.545 110.962,53.545 111.886,52.621 v2(111.886,52.578)
DIO: U1.34 U3.4 | length 10.8
  Top Layer w0.254: U1.34 v2(105.409,54.074)
  Bottom Layer w0.178: v2(105.409,54.074) 105.409,53.002 106.866,51.545 v2(113.127,51.545)
GND: "3   G   C   D   X.2" "V  5  3  T  R  G.1" +.2 C1.2 C2.1 C3.2 C4.2 C5.2 C8.2 C9.1 C10.1 C11.2 C12.2 C15.1 C16.1 C17.1 C18.1 C20.2 C21.2 C22.1 C23.1 C24.1 C26.2 C27.2 GND.1 IC1.0 IC1.1 IC1.11 IC1.18 IC2.2 Q1.2 Q2.2 Q3.2 Q4.2 Q5.2 R5.1 R6.2 R8.2 R9.1 R10.1 R11.1 R19.2 R20.2 R33.2 T1.1 U1.8 U1.23 U1.35 U1.47 U2.9 U2.10 U3.2 U3.5 U3.6 U4.9 U4.11 U5.1 U5.7
  other v1: 118.411,45.361 119.169,45.943 111.129,48.277 85.709,52.871 86.528,52.871 95.777,58.564 101,59.657 91.05,65.669 98.724,67.679 90.283,69.636 100.741,69.636 101.358,70.768 103.888,73.965 98.405,75.337 99.199,75.843 100.883,85.87 85.192,87.534 86.631,87.534
LED: Q5.1 R11.2 U1.29 | length 21.9
  Top Layer w0.203: v2(102.474,51.605) 103.154,51.605 103.17,51.589 103.984,51.589 U1.29 ; R11.2@110.962,66.48 112.75,66.48 Q5.1
  Bottom Layer w0.203: v2(102.474,51.605) 103.758,52.889 103.758,56.05 107.365,59.657 107.365,62.847 v2(110.962,66.444)
MPU_SCL: IC1.23 R2.2 U1.42 | length 20
  Top Layer w0.203: v2(95.228,65.466) 95.228,62.167 96.63,60.765 98.837,60.765 100.199,59.403 U1.42 ; v2(96.749,70.024) 96.799,70.024 97.299,69.524 IC1.23
  Bottom Layer w0.203: v2(95.228,65.466) 95.228,68.603 96.646,70.02 96.745,70.02 v2(96.749,70.024)
MPU_SDA: IC1.24 R1.2 U1.43 | length 18.6
  Top Layer w0.254: IC1.24 97.785,69.024 97.172,68.411 97.172,68.361 96.799,67.988 R1.2 96.699,67.988 96.326,67.615 96.326,67.565 94.604,65.843 94.604,61.954 96.317,60.241 98.786,60.241 99.699,59.328 U1.43
MPWM1: Q2.1 R9.2 U1.16 | length 79.2
  Top Layer w0.254: R9.2 83.089,90.948 Q2.1 82.894,90.739 82.894,84.298 87.139,80.053 93.344,80.053 94.92,78.477 94.92,71.499 92.329,68.908 92.329,64.168 89.291,61.13 83.966,61.13 81.018,58.182 81.018,53.193 87.939,46.271 97.986,46.271 98.699,46.984 U1.16
MPWM2: Q1.1 R8.1 U1.17 | length 63.9
  Top Layer w0.254: v2(99.155,46.605) 99.199,46.649 U1.17 ; v2(116.712,47.795) 116.745,47.795 121.454,52.504 121.454,86.078 R8.1 Q1.1@120.822,88.118
  Bottom Layer w0.254: v2(99.155,46.605) 99.637,46.123 106.971,46.123 107.712,45.382 114.299,45.382 v2(116.712,47.795)
MPWM3: Q3.1 R19.1 U1.18 | length 25.5
  Top Layer w0.254: R19.1 80.122,53.175 81.316,51.981 Q3.1 87.503,45.684 ccw(c87.683,45.864) 87.683,45.61 98.641,45.61 ccw(c98.641,45.864) 98.648,45.61 cw(c101,-34.572) 98.937,45.618 ccw(c98.93,45.872) 99.11,45.692 99.688,46.271 99.688,47.485 99.694,47.491 99.694,48.269 U1.18
MPWM4: Q4.1 R20.1 U1.19 | length 23.4
  Top Layer w0.254: U1.19 100.199,46.926 101.408,45.717 101.409,45.716 ccw(c101.588,45.896) 101.586,45.642 cw(c101,-34.572) 103.352,45.61 ccw(c103.359,45.864) 103.359,45.61 116.073,45.61 ccw(c116.073,45.864) 116.252,45.684 R20.1 Q4.1@120.11,49.542
NetC1_1: C1.1 IC1.20 | length 2.6
  Top Layer w0.254: C1.1 97.209,72.035 97.209,71.815 98,71.024 IC1.20
NetC2_2: C2.2 IC1.8 R4.1 | length 4.6
  Top Layer w0.254: IC1.8 104.528,69.524 104.901,69.897 R4.1 107.17,69.946 C2.2
NetC3_1: C3.1 IC1.10 | length 3.1
  Top Layer w0.254: IC1.10 102.842,70.529 103.19,70.529 104.595,71.934 104.595,72.279 C3.1
NetC6_1: C6.1 D1.1 M2.2 Q1.3
NetC7_1: C7.1 D2.1 M1.2 Q2.3
NetC9_2: C9.2 U1.5 Y1.2 | length 7.2
  Top Layer w0.254: C9.2@89.855,55.827 90.745,55.827 92.129,54.443 92.529,54.443 93.898,53.074 U1.5
NetC10_2: C10.2 U1.6 Y1.1 | length 7
  Top Layer w0.254: C10.2@89.855,50.19 92.076,50.19 Y1.1 92.529,50.443 93.402,51.316 94.66,52.574 U1.6
NetC13_1: C13.1 D3.1 M3.2 Q3.3
NetC14_1: C14.1 D4.1 M4.2 Q4.3
NetC19_2: C19.2 IC2.3 R31.1 R33.1
NetC24_2: C24.2 U4.10 | length 2.1
  Top Layer w0.254: C24.2 98.724,64.46 99.062,64.798 99.062,64.823 99.81,65.571 U4.10
NetC25_1: C25.1 U4.12 | length 4.5
  Top Layer w0.254: C25.1 96.671,64.46 97.009,64.122 97.009,64.097 97.436,63.67 99.438,63.67 99.587,63.819 99.587,63.832 100.203,64.447 100.203,64.547 100.226,64.57 U4.12
NetC25_2: C25.2 U4.8 | length 4.7
  Top Layer w0.254: C25.2 96.671,66 97.009,66.338 97.009,66.363 97.416,66.77 100.951,66.77 100.974,66.747 U4.8
NetD5_1: D5.1 IC2.1 L1.2
NetIC1_9: IC1.9 R5.2 | length 5.6
  Top Layer w0.254: IC1.9 103.501,70.024 103.888,70.411 103.888,70.414 104.275,70.801 104.278,70.801 105.148,71.671 106.552,71.671 106.767,71.886 106.767,72.503 R5.2
NetIC2_4: IC2.4 R30.2 | length 4
  Top Layer w0.635: IC2.4 92.039,69.524 93.657,71.141 93.657,72.206 R30.2
NetLED1_1: LED1.1 Q5.3
  other v1: 115.188,64.447 116.204,64.447 116.204,65.446
NetPOWER1_1: +.1 ON.2
NetR7_2: R7.2 U2.3 | length 5.6
  Bottom Layer w0.254: v2(90.891,47.14) 90.93,47.178 90.93,47.322 90.931,49.319 92.19,50.578 U2.3
NetR10_2: R10.2 U1.44 | length 2.3
  Top Layer w0.254: R10.2@99.148,58.674 99.199,58.623 U1.44
POWER: C4.1 C5.1 R3.2 R6.1 U1.14 | length 23.9
  Top Layer w0.203: U1.14 97.699,49.626 v2(97.721,49.647)
  VCC w0.203: v2(97.721,49.647) 97.721,51.029 106.598,59.906 v1(115.188,59.906)
RX: RXD.1 U1.31 | length 33.1
  Top Layer w0.178: v2(102.474,52.578) 103.995,52.578 U1.31
  Bottom Layer w0.178: RXD.1 99.949,63.412 99.376,62.839 99.376,60.918 99.949,60.345 99.949,58.337 99.948,58.336 99.948,55.017 102.344,52.621 102.432,52.621 v2(102.474,52.578)
RX3: U1.22 U2.16 | length 8.4
  Top Layer w0.254: U1.22 101.699,46.993 102.187,46.506 v1(108.584,46.506)
TOF_SCL: "3   G   C   D   X.3" SCL1.1 U1.27 U4.1 U5.4 | length 57.6
  Top Layer w0.178: v2(101.981,64.77) 102.027,64.77 102.225,64.572 U4.1 ; 110.743,84.879 113.127,82.495 113.127,76.604 111.151,74.629 U5.4
  Top Layer w0.254: U4.1 103.226,64.572 103.249,64.549 103.249,64.449 105.806,61.892 ; U1.27 106.123,50.574 106.933,51.384 106.933,60.765 105.806,61.892 ; SCL1.1 105.806,62.088 105.806,61.892
  Bottom Layer w0.178: v2(101.981,64.77) 101.981,76.117 110.743,84.879
TOF_SDA: "3   G   C   D   X.4" SDA1.1 U1.28 U4.16 U5.3 | length 51.1
  Top Layer w0.203: 110.743,82.339 109.376,80.972 109.376,74.9 110.811,73.466 110.909,73.466 110.931,73.444 111.028,73.444 U5.3
  Top Layer w0.254: U4.16 v2@103.074,63.921 ; v2@103.126,63.921 106.501,60.546 106.501,58.971 ; U1.28 106.001,51.074 106.501,51.574 106.501,58.971 ; SDA1.1 106.501,58.971
  Bottom Layer w0.254: v2(103.074,63.869) 103.074,75.707 109.706,82.339 110.743,82.339
TX3: U1.21 U2.15 | length 10.2
  Top Layer w0.254: U1.21 101.199,46.605 101.218,46.586 101.223,46.591 v2(101.223,46.657)
  Bottom Layer w0.254: v2(101.223,46.657) 101.227,46.652 105.663,46.652 107.441,48.43 108.748,48.43 U2.15
UART2_RX: "V  5  3  T  R  G.2" U1.13 | length 44.5
  Top Layer w0.254: v2(97.199,46.995) U1.13 ; v2(106.667,50.192) 106.704,50.229 116.495,50.229 120.11,53.844 120.11,67.753 118.879,68.984
  Bottom Layer w0.254: v2(97.199,46.995) 97.16,47.034 97.16,47.178 97.154,47.184 97.154,49.904 97.564,50.314 106.49,50.314 106.612,50.192 v2(106.667,50.192)
UART2_TX: "V  5  3  T  R  G.3" U1.12 | length 46.2
  Top Layer w0.203: U1.12 95.91,49.585 96.871,49.585 97.575,50.289 98.089,50.289 v2(98.805,49.573)
  Top Layer w0.254: v2(117.381,49.573) 117.442,49.573 120.744,52.875 120.744,69.659 118.879,71.524
  Bottom Layer w0.203: v2(98.805,49.573) v2(117.381,49.573)
VCC: "V  5  3  T  R  G.6" C6.2 C7.2 C13.2 C14.2 C17.2 D1.2 D2.2 D3.2 D4.2 IC2.5 L1.1 LED1.2 M1.1 M2.1 M3.1 M4.1 ON.1 R3.1 R30.1 | length 163.2
  Bottom Layer w0.762: M3.1 75.31,49.446 88.518,62.654 88.518,76.497 ; M1.1 82.246,91.314 88.518,91.314 ; ON.1 88.311,76.29 88.518,76.497 ; 88.518,76.29 v1(92.549,76.29) v1(93.49,76.29) ; 121.234,90.983 121.234,48.903 M4.1 ; M2.1 124.06,94.132 121.242,91.314 88.518,91.314 ; 88.518,76.497 88.518,91.314
  other v1: 111.129,57.447 112.433,57.447 115.061,62.4 116.458,62.4 82.036,73.965 83.283,73.965 80.844,73.994
XSHUT: "3   G   C   D   X.5" U1.41 | length 27.6
  Top Layer w0.203: U1.41 100.699,58.174 v2(100.707,58.182)
  Bottom Layer w0.203: v2(100.707,58.182) 100.707,58.206 103.364,60.863 103.364,63.276 103.631,63.543 103.631,72.687 110.743,79.799
pads on no net: IC1.2 IC1.3 IC1.4 IC1.5 IC1.6 IC1.7 IC1.12 IC1.14 IC1.15 IC1.16 IC1.17 IC1.19 IC1.21 IC1.22 IC2.6 ON.3 U1.2 U1.3 U1.4 U1.7 U1.10 U1.11 U1.15 U1.20 U1.25 U1.26 U1.30 U1.32 U1.33 U1.38 U1.39 U1.40 U1.45 U1.46 U2.2 U2.4 U2.5 U2.6 U2.7 U2.13 U2.14 U2.17 U2.18 U2.19 U2.20 U2.21 U2.22 U4.3 U4.5 U4.6 U4.7 U4.14 U4.15 U5.2 U5.5
copper on no net:
  other v3: 64.557,33.994 137.117,33.994 64.557,106.554 137.117,106.554

## Polygon pours and split planes (outlines as drawn)
GND on Top Layer "Top Layer-GND" (solid, remove dead copper, pour order 32): 59.533,35.533 65.533,29.533 77.75,41.75 cw(c101,-34.572) 124.25,41.75 136.508,29.492 142.508,35.492 128.817,49.183 128.77,49.136 cw(c145.307,65.673) 121.92,65.786 121.92,76.233 cw(c145.307,76.233) 128.85,92.85 142,106 136,112 122.836,98.836 122.822,98.85 cw(c106.285,115.387) 106.172,92 106.169,92.003 95.738,92.003 cw(c95.738,115.391) 79.121,98.933 79.094,98.906 66,112 60,106 73.151,92.849 73.15,92.85 cw(c56.613,76.313) 80,76.2 80,64.008 cw(c60.38,64.008) 74.186,50.068 74.127,50.127
3.3 on Top Layer "NetC7_1" (solid, remove dead copper, pour order 18): 108.965,88.23 109.932,89.197 111.575,89.197 111.575,90.664 101.336,90.664 96.671,85.999 96.671,78.529 100.587,78.529 101.087,79.029 101.087,83.228 108.965,83.228
VCC on Top Layer "NetC7_1" (solid, remove dead copper, pour order 14): 78.877,73.382 78.939,73.32 90.17,73.32 90.17,70.849 90.846,70.173 91.981,70.173 92.971,71.163 92.971,73.195 94.36,73.195 94.36,78.307 94.138,78.529 93.638,79.029 78.877,79.029
VCC on Top Layer "NetC7_1" (solid, remove dead copper, pour order 8): 122.779,38.241 118.077,42.943 123.411,48.277 128.113,43.575
VCC on Top Layer "NetC7_1" (solid, remove dead copper, pour order 7): 70.293,50.145 74.663,54.514 79.997,49.18 75.627,44.811
VCC on Top Layer "NetC7_1" (solid, remove dead copper, pour order 3): 74.675,96.69 80.199,102.215 85.533,96.881 80.009,91.356
NetPOWER1_1 on Top Layer "NetC7_1" (solid, remove dead copper, pour order 15): 80.318,73.195 85.343,73.195 85.343,66.207 86.631,64.919 86.631,61.511 83.908,61.511 83.781,61.638 83.781,64.089 82.299,65.571 80.318,65.571
NetC19_2 on Top Layer "NetC7_1" (solid, remove dead copper, pour order 12): 85.837,69.024 86.431,69.024 87.431,70.024 89.026,70.024 89.026,69.925 90.677,68.274 91.803,68.283 91.947,68.139 91.947,66.652 88.137,66.652 87.177,67.612 85.837,67.612
VCC on Top Layer "NetC7_1" (solid, remove dead copper, pour order 24): 110.108,59.86 113.081,59.86 113.127,59.906 113.127,56.804 110.751,56.804 110.108,57.447
POWER on Top Layer "NetC7_1" (solid, remove dead copper, pour order 20): 113.41,61.638 113.41,58.174 117.22,58.174 117.22,61.638
NetLED1_1 on Top Layer "NetC7_1" (solid, remove dead copper, pour order 19): 114.553,66.77 114.553,64.097 116.814,64.097 116.839,64.122 116.839,66.77
5V on Top Layer "NetC7_1" (solid, remove dead copper, pour order 16): 91.947,85.87 93.565,85.87 96.892,89.197 98,89.197 98,87.484 97.313,86.797 97.313,84.276 96.265,83.228 91.947,83.228
NetD5_1 on Top Layer "NetC7_1" (solid, remove dead copper, pour order 13): 85.837,72.814 87.121,72.814 87.121,77.031 87.603,77.513 89.788,77.513 90.042,77.259 90.042,71.024 85.837,71.024
VCC on Top Layer "NetC7_1" (solid, remove dead copper, pour order 9): 131.366,90.422 126.982,86.038 121.647,91.372 126.032,95.756
NetC6_1 on Top Layer "NetC7_1" (solid, remove dead copper, pour order 6): 122.52,99.538 122.52,99.284 125.949,95.855 118.879,88.785 118.287,88.785 112.995,94.077
NetC14_1 on Top Layer "NetC7_1" (solid, remove dead copper, pour order 5): 131.879,47.075 131.625,47.075 128.196,43.646 121.126,50.717 121.126,51.308 126.418,56.6
NetC13_1 on Top Layer "NetC7_1" (solid, remove dead copper, pour order 4): 79.02,37.461 79.02,41.392 75.591,44.821 81.6,50.83 89.157,43.273
NetC7_1 on Top Layer "NetC7_1" (solid, remove dead copper, pour order 2): 70.992,93.261 71.246,93.261 74.675,96.69 81.613,89.752 76.141,84.28
VCC on VCC "VCC-VCC" (solid, remove dead copper, pour order 33): 59.533,35.533 65.533,29.533 77.75,41.75 cw(c101,-34.572) 124.25,41.75 136.508,29.492 142.508,35.492 128.817,49.183 128.77,49.136 cw(c145.307,65.673) 121.92,65.786 121.92,76.233 cw(c145.307,76.233) 128.85,92.85 142,106 136,112 122.836,98.836 122.822,98.85 cw(c106.285,115.387) 106.172,92 106.169,92.003 95.738,92.003 cw(c95.738,115.391) 79.121,98.933 79.094,98.906 66,112 60,106 73.151,92.849 73.15,92.85 cw(c56.613,76.313) 80,76.2 80,64.008 cw(c60.38,64.008) 74.186,50.068 74.127,50.127
GND on Bottom Layer "Bottom Layer-GND" (solid, remove dead copper, pour order 34): 59.533,35.533 65.533,29.533 77.75,41.75 cw(c101,-34.572) 124.25,41.75 136.508,29.492 142.508,35.492 128.817,49.183 128.77,49.136 cw(c145.307,65.673) 121.92,65.786 121.92,76.233 cw(c145.307,76.233) 128.85,92.85 142,106 136,112 122.836,98.836 122.822,98.85 cw(c106.285,115.387) 106.172,92 106.169,92.003 95.738,92.003 cw(c95.738,115.391) 79.121,98.933 79.094,98.906 66,112 60,106 73.151,92.849 73.15,92.85 cw(c56.613,76.313) 80,76.2 80,64.008 cw(c60.38,64.008) 74.186,50.068 74.127,50.127
GND on GND (split plane): 261 vertices, not listed, extent 60.255,30.213 141.787,111.278

## Keep-outs
Keep-Out Layer:
  lines w0.254: 73.15,92.85 cw(c56.613,76.313) 80,76.2 80,64.008 cw(c60.38,64.008) 74.186,50.068 ; 73.151,92.849 73.151,92.849 60,106 66,112 79.094,98.906 ; 74.127,50.127 59.533,35.533 65.533,29.533 77.75,41.75 cw(c101,-34.572) 124.25,41.75 136.508,29.492 142.508,35.492 128.817,49.183 ; 79.121,98.933 ccw(c95.738,115.391) 95.738,92.003 106.169,92.003 ; 106.172,92 ccw(c106.285,115.387) 122.822,98.85 ; 122.836,98.836 136,112 142,106 128.85,92.85 ccw(c145.307,76.233) 121.92,76.233 121.92,65.786 ccw(c145.307,65.673) 128.77,49.136

## Silkscreen, mask and mechanical layers (free items; w line width, h text height)
Top Overlay:
  lines w0.635: 89.93,83.096 89.93,88.065
  lines w0.762: 89.93,83.096 91.092,84.258 88.787,84.258 89.93,83.115
  text "+" at 78.358,97.727 h0.64
  text "+" at 127.253,92.184 h0.64
  text "+" at 73.786,47.816 h0.64
  text "+" at 124.713,42.228 h0.64
Bottom Overlay:
  text "GEARDRONE" at 87.421,58.717 h3.81 r270

## Text inside footprints (layer, text, board x,y; h text height)
L1: Mechanical 5 "C4.5 H3.2 W4.0 L4.5" at 92.332,77.635 h0.25 r180
LED1: Bottom Overlay "+" at 116.052,61.219 h0.64